# Altium PCB STM32F405RGT6.PcbDoc
Units mil, origin at the board's own origin, x right, y up, seen from the top; angles counter-clockwise.
Board outline 1579.83 x 1186.13 mil, 2 copper layers (Top Layer, Bottom Layer); 36 components, 68 nets, 220 pads, 109 vias.
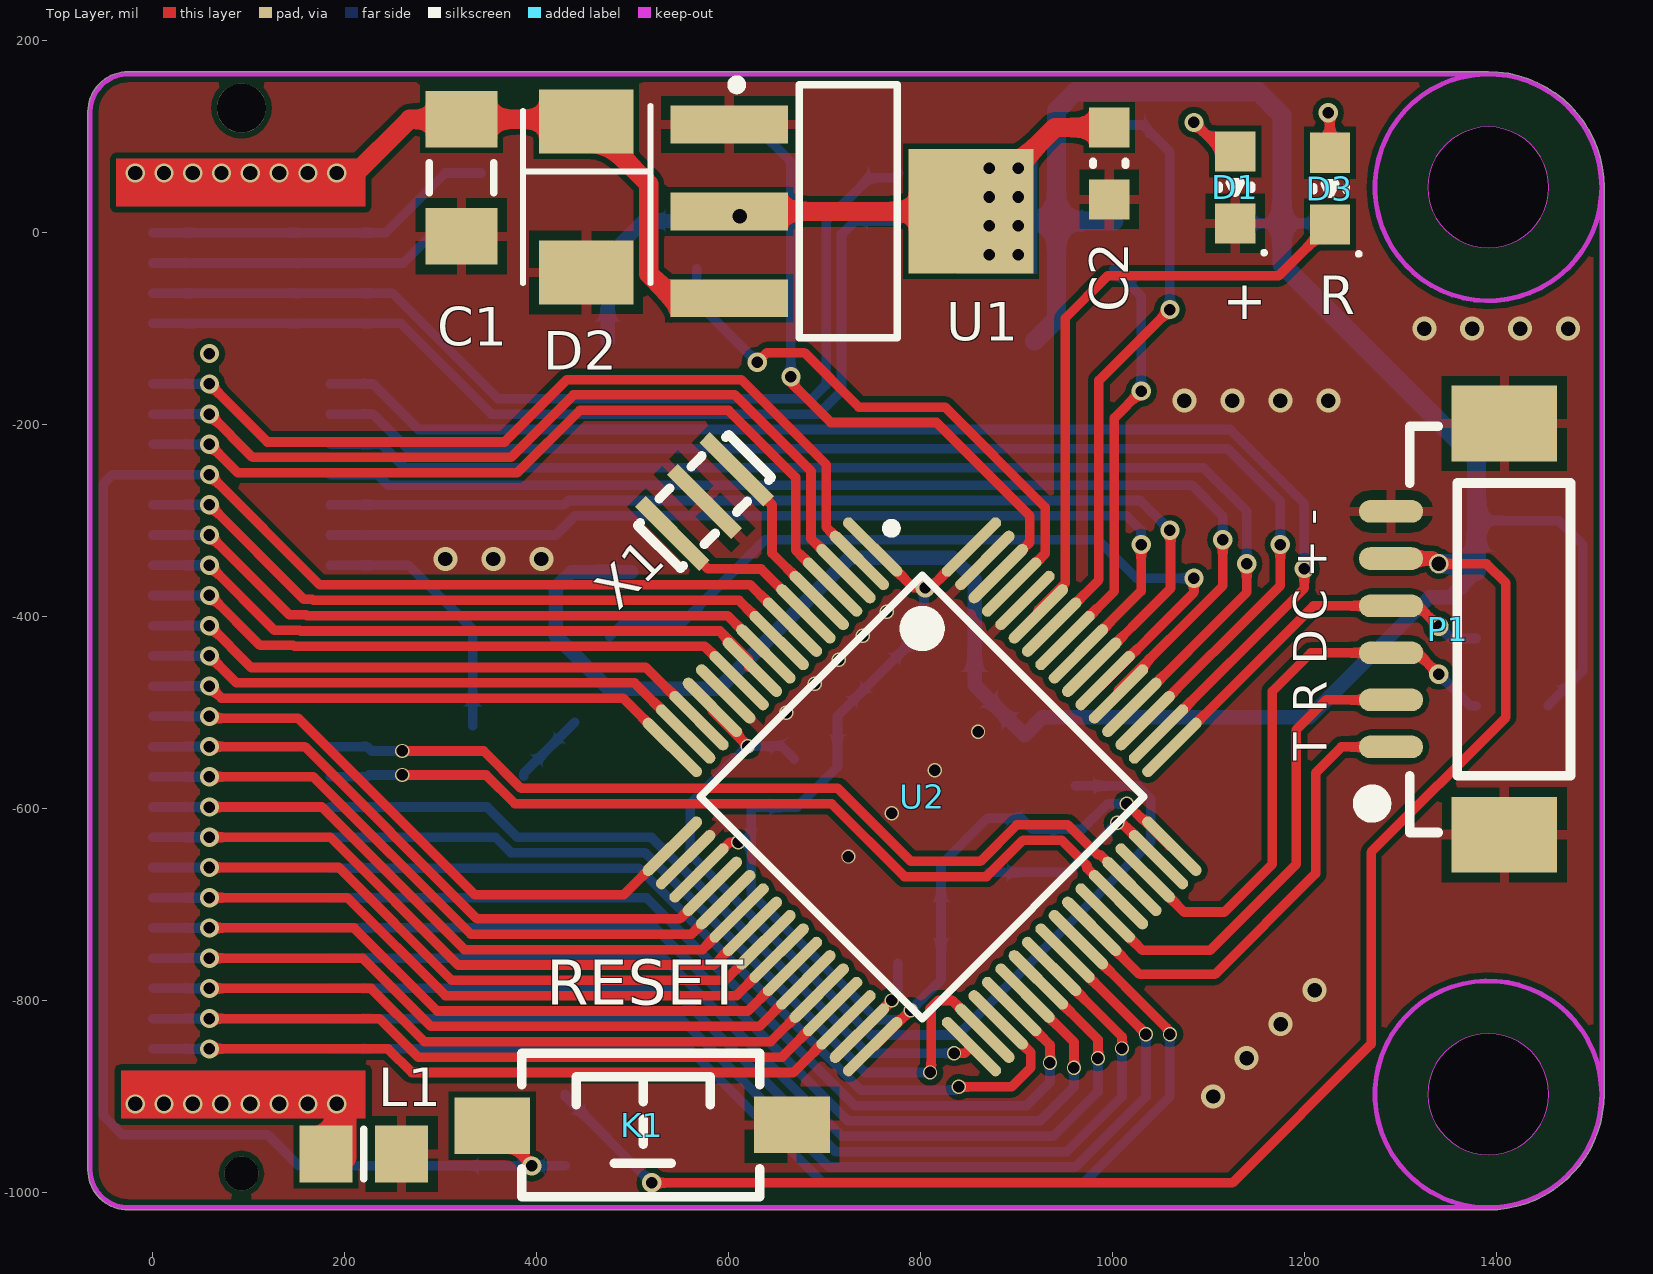
[diagram p0: Top Layer view]
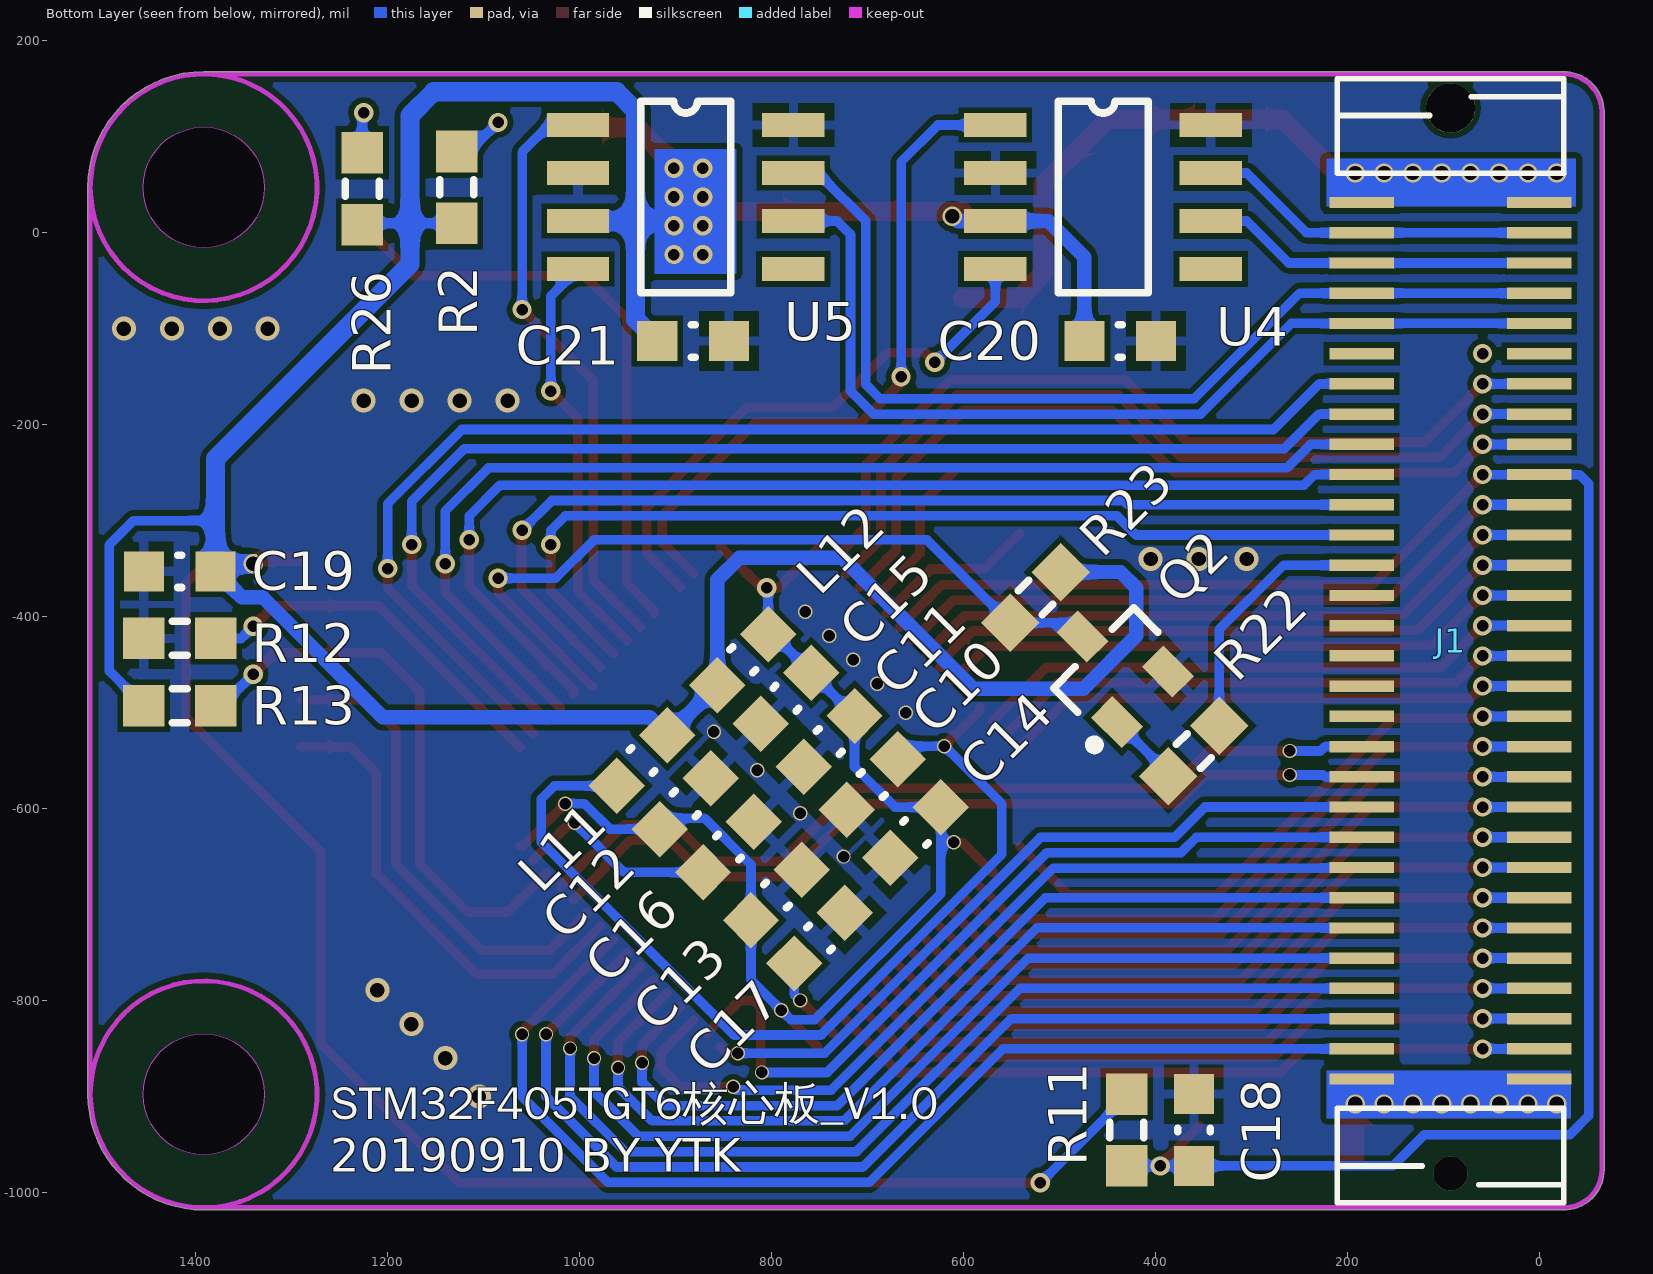
[diagram p1: Bottom Layer view, seen from below]

## Layer stack, top to bottom
Top Solder: solder mask 0.4, Solder Resist, Dk 3.5
Top Layer: signal copper 1.4
Dielectric 1: dielectric 12.6, FR-4, Dk 4.8
Bottom Layer: signal copper 1.4
Bottom Solder: solder mask 0.4, Solder Resist, Dk 3.5

## Board outline
-67.48,-976.38 cw(c-64.96,-976.38) -67.48,-976.36 -67.48,125.98 cw(c-64.96,125.98) -67.48,126.01 cw(c-25.59,125.98) -25.59,167.87 1391.73,167.87 cw(c1391.73,165.35) 1391.76,167.87 cw(c1391.73,47.24) 1512.36,47.24 1512.36,-897.64 cw(c1391.73,-897.64) 1391.73,-1018.26 -25.59,-1018.26 cw(c-25.59,-1015.75) -25.61,-1018.26 cw(c-25.59,-976.38)
cut-out: 1328.74,-897.64 ccw(c1391.73,-897.64) 1391.73,-960.63 ccw(c1391.73,-897.64) 1454.72,-897.64 ccw(c1391.73,-897.64) 1391.73,-834.65 ccw(c1391.73,-897.64)
cut-out: 1328.74,47.24 ccw(c1391.73,47.24) 1391.73,-15.75 ccw(c1391.73,47.24) 1454.72,47.24 ccw(c1391.73,47.24) 1391.73,110.24 ccw(c1391.73,47.24)

## Design rules (kind name [scope] priority, off if disabled: settings)
Clearance 24V [InNetClass('24V')] p1: gap=12
Clearance [All] p2: gap=6
ComponentClearance [All] p1: gap=0 collisioncheckmode=3 verticalgap=0 showdistances=FALSE
DiffPairsRouting [All] p1: maxlimit=10 minlimit=6 mostfreqgap=6 toplayer_minwidth=10 toplayer_maxwidth=10 toplayer_prefwidth=10 bottomlayer_minwidth=10 bottomlayer_maxwidth=10 bottomlayer_prefwidth=10 maxuncoupledlength=500
HoleSize [All] p1: absolutevalues=TRUE maxlimit=10000 minlimit=12 maxpercent=80.000 minpercent=20.000
HoleToHoleClearance [All] p1: gap=6 allowstackedmicrovias=TRUE
MinimumSolderMaskSliver [All] p1: minsoldermaskwidth=0
PolygonConnect VIA [OnLayer('Multi-Layer')] p1: connectstyle=Direct reliefconductorwidth=10 reliefentries=4 polygonreliefangle="90 Angle" airgapwidth=10
PolygonConnect [All] p2: connectstyle=Relief reliefconductorwidth=10 reliefentries=4 polygonreliefangle="90 Angle" airgapwidth=10
RoutingVias [All] p1: holewidth=12 width=15 viastyle="Through Hole" minholewidth=12 minwidth=12 maxholewidth=200 maxwidth=200
SilkToBoardRegionClearance [All] p1 off:
SilkToSilkClearance [All] p1: silktosilkclearance=0
SilkToSolderMaskClearance [IsPad] p1: minsilkscreentomaskgap=0 clearancetoexposedcopper=TRUE
SolderMaskExpansion [All] p1: expansion=4
Width [All] p1: maxlimit=10000 minlimit=6 preferedwidth=10
22 further rules are at their usual default settings.

## Classes and differential pairs
component class 01_STM32F4最小系统: C10 C11 C12 C13 C14 C15 C16 C17 C18 C19 K1 L11 L12 P1 R11 R12 R13 U2 X1
component class 00_连接器和电源: C1 C2 D1 D2 J1 L1 R2 U1
component class 02_其它: C20 C21 D3 Q2 R22 R23 R26 U4 U5
differential pair CAN2: +CAN2_P -CAN2_N
differential pair CAN1: +CAN1_P -CAN1_N
differential pair OSC_8M: +OSC_8M_P -OSC_8M_N
differential pair USB: +USB_P -USB_N

## Components (designator, comment, footprint, x,y, rotation, side; value= is the part's Value field where it differs from the comment)
C1 "22uF/16V" C1206/3216 321.73,57.24 r90 top
C2 "226" C0603/1608 996.73,72.24 r90 top
C10 "104" C0603/1608 695,-575 r315 bottom
C11 "106" C0603/1608 740,-530 r135 bottom
C12 "104" C0603/1608 890,-595 r315 bottom
C13 "104" C0603/1608 795,-690 r315 bottom
C14 "104" C0603/1608 650,-625 r135 bottom
C15 "104" C0603/1608 785,-485 r135 bottom
C16 "225" C0603/1608 845,-640 r315 bottom
C17 "225" C0603/1608 750,-735 r315 bottom
C18 "105" C0603/1608 360,-935 r270 bottom
C19 "104" C0603/1608 1416.73,-352.76 r0 bottom
C20 "104" C0603/1608 436.73,-112.76 r180 bottom
C21 "104" C0603/1608 881.73,-112.76 r180 bottom
D1 "LED-红色" LED0603-红色 1128.03,47.24 r270 top
D2 "SMAJ5.0A" DO-214AC/SMA 451.73,37.24 r90 top
D3 "LED-绿色" LED0603-绿色 1226.73,45.94 r270 top
J1 "STM32F405RGT6核心板" 3710M060037G0FR01 92.52,-425.2 r180 bottom
K1 "KEY" 按键（2脚） 510,-930 r0 top
L1 "UPZ2012E221" L0805/2012 220,-960 r0 top
L11 "UPZ1608E101" L0603/1608 935,-550 r315 bottom
L12 "UPZ1608E101" L0603/1608 830,-445 r135 bottom
P1 "GH1.25-6P-SW\UART\3.3V" GH1.25-6P（卧贴） 1290.35,-535.74 r270 top
Q2 "PMBT3904" SOT-23-3 440,-510 r45 bottom
R2 "1k" R0603/1608 1128.03,47.24 r270 bottom
R11 "1k" R0603/1608 430,-935 r270 bottom
R12 "10k" R0603/1608 1416.73,-422.76 r180 bottom
R13 "10k" R0603/1608 1416.73,-492.76 r180 bottom
R22 "4k7" R0603/1608 360,-540 r135 bottom
R23 "4k7" R0603/1608 525,-380 r315 bottom
R26 "1k" R0603/1608 1226.73,45.94 r270 bottom
U1 "AMS1117-3.3V" SOT-223 726.73,22.24 r0 top
U2 "STM32F405RGT6" LQFP64 801.73,-587.76 r315 top
U4 "SN65HVD230" SOP-8 566.73,112.24 r180 bottom
U5 "SN65HVD230" SOP-8 1001.73,112.24 r180 bottom
X1 "8MHz" XTAL-3213 575,-280 r225 top

## Footprints (in the part's own frame and the unit in brackets; to place one, negate y for a bottom-side part, rotate by r counter-clockwise, add the part's x,y. Pads: shape width x height; smd on the part's side, far side on the other; paste and mask are expansions set on the pad)
3710M060037G0FR01 [mm]
  rect 1.7x0.3 smd: 1(2.35,11.6) 2(2.35,10.8) 3(2.35,10) 4(2.35,9.2) 5(2.35,8.4) 6(2.35,7.6) 7(2.35,6.8) 8(2.35,6) 9(2.35,5.2) 10(2.35,4.4) 11(2.35,3.6) 12(2.35,2.8) 13(2.35,2) 14(2.35,1.2) 15(2.35,0.4) 16(2.35,-0.4) 17(2.35,-1.2) 18(2.35,-2) 19(2.35,-2.8) 20(2.35,-3.6) 21(2.35,-4.4) 22(2.35,-5.2) 23(2.35,-6) 24(2.35,-6.8) 25(2.35,-7.6) 26(2.35,-8.4) 27(2.35,-9.2) 28(2.35,-10) 29(2.35,-10.8) 30(2.35,-11.6) 31(-2.35,-11.6) 32(-2.35,-10.8) 33(-2.35,-10) 34(-2.35,-9.2) 35(-2.35,-8.4) 36(-2.35,-7.6) 37(-2.35,-6.8) 38(-2.35,-6) 39(-2.35,-5.2) 40(-2.35,-4.4) 41(-2.35,-3.6) 42(-2.35,-2.8) 43(-2.35,-2) 44(-2.35,-1.2) 45(-2.35,-0.4) 46(-2.35,0.4) 47(-2.35,1.2) 48(-2.35,2) 49(-2.35,2.8) 50(-2.35,3.6) 51(-2.35,4.4) 52(-2.35,5.2) 53(-2.35,6) 54(-2.35,6.8) 55(-2.35,7.6) 56(-2.35,8.4) 57(-2.35,9.2) 58(-2.35,10) 59(-2.35,10.8) 60(-2.35,11.6)
  round 0.9 hole 0.9: FH(0,-14.1)
  round 1.3 hole 1.3: FH(0,14.1)
  silkscreen extent -3,-14.87 3,14.87
C0603/1608 [mm] "0603/1608贴片陶瓷电容"
  rect 1.06x1.06 smd: 1(-0.95,0) 2(0.95,0)
  silkscreen extent -0.05,-0.43 0.05,0.43, body extent -1.29,-0.48 1.31,0.53, height 0.95
C1206/3216 [mm] "1206/3216贴片陶瓷电容"
  rect 1.5x1.9 smd: 1(-1.55,0) 2(1.55,0)
  silkscreen extent -0.4,-0.85 0.4,0.85, body extent -2.18,-0.92 2.02,0.88, height 0.95
DO-214AC/SMA [mm]
  rect 1.7x2.5 smd: 1(-2,0) 2(2,0)
  silkscreen extent -2.29,-1.7 2.41,1.68, body extent -2.85,-1.25 2.85,1.25, height 1.9
GH1.25-6P（卧贴） [mm]
  rect 2x2.8 smd: 0(-8.559,3) 0(2.325,3)
  oval 0.6x1.7 smd: 1(0,0) 2(-1.245,0) 3(-2.489,0) 4(-3.734,0) 5(-4.984,0) 6(-6.234,0)
  silkscreen extent -8.48,-0.75 2.27,4.75, body extent -9.44,-0.25 3.21,4.95, height 3.5
L0603/1608 [mm] "0603/1608贴片磁珠"
  rect 1.06x1.06 smd: 1(-0.95,0) 2(0.95,0)
  silkscreen extent -0.05,-0.43 0.05,0.43, body extent -0.9,-0.5 0.9,0.5, height 1
L0805/2012 [mm] "0805/2012贴片磁珠"
  rect 1.4x1.5 smd: 1(-1,0) 2(1,0)
  silkscreen extent 0,-0.65 0,0.65, body extent -1.07,-0.7 1.08,0.7, height 0.7
LED0603-红色 [mm]
  rect 1.06x1.06 smd: 1(-0.95,0) 2(0.95,0)
  silkscreen extent -0.13,-0.43 1.78,0.81, body extent -0.8,-0.4 0.8,0.4, height 0.79
LED0603-绿色 [mm]
  rect 1.06x1.06 smd: 1(-0.95,0) 2(0.95,0)
  silkscreen extent -0.13,-0.43 1.78,0.81, body extent -0.8,-0.4 0.8,0.4, height 0.35
LQFP64 [mm]
  oval 2.1x0.3 smd: 1(-5.6,3.75) 2(-5.6,3.25) 3(-5.6,2.75) 4(-5.6,2.25) 5(-5.6,1.75) 6(-5.6,1.25) 7(-5.6,0.75) 8(-5.6,0.25) 9(-5.6,-0.25) 10(-5.6,-0.75) 11(-5.6,-1.25) 12(-5.6,-1.75) 13(-5.6,-2.25) 14(-5.6,-2.75) 15(-5.6,-3.25) 16(-5.6,-3.75) 33(5.6,-3.75) 34(5.6,-3.25) 35(5.6,-2.75) 36(5.6,-2.25) 37(5.6,-1.75) 38(5.6,-1.25) 39(5.6,-0.75) 40(5.6,-0.25) 41(5.6,0.25) 42(5.6,0.75) 43(5.6,1.25) 44(5.6,1.75) 45(5.6,2.25) 46(5.6,2.75) 47(5.6,3.25) 48(5.6,3.75)
  oval 0.3x2.1 smd: 17(-3.75,-5.6) 18(-3.25,-5.6) 19(-2.75,-5.6) 20(-2.25,-5.6) 21(-1.75,-5.6) 22(-1.25,-5.6) 23(-0.75,-5.6) 24(-0.25,-5.6) 25(0.25,-5.6) 26(0.75,-5.6) 27(1.25,-5.6) 28(1.75,-5.6) 29(2.25,-5.6) 30(2.75,-5.6) 31(3.25,-5.6) 32(3.75,-5.6) 49(3.75,5.6) 50(3.25,5.6) 51(2.75,5.6) 52(2.25,5.6) 53(1.75,5.6) 54(1.25,5.6) 55(0.75,5.6) 56(0.25,5.6) 57(-0.25,5.6) 58(-0.75,5.6) 59(-1.25,5.6) 60(-1.75,5.6) 61(-2.25,5.6) 62(-2.75,5.6) 63(-3.25,5.6) 64(-3.75,5.6)
  silkscreen extent -5.72,-4.15 4.15,4.57, body extent -6,-6 6,6, height 1.6
R0603/1608 [mm] "0603/1608贴片电阻"
  rect 1.1x1.1 smd: 1(-0.95,0) 2(0.95,0)
  silkscreen extent -0.2,-0.45 0.2,0.45, body extent -0.8,-0.4 0.8,0.4, height 0.45
SOP-8 [mil]
  rect 65x25 smd: 1(0,0) 2(0,-50) 3(0,-100) 4(0,-150) 5(224.41,-150) 6(224.41,-100) 7(224.41,-50) 8(224.41,0)
  silkscreen extent 65,-175 159,25
SOT-23-3 [mm]
  rect 1.15x0.8 smd: 1(0,0) 2(0,-1.9) 3(2.25,-0.95)
  silkscreen extent -0.12,-2.45 1.82,0.97, body extent -0.38,-2.5 2.62,0.6, height 1.1
SOT-223 [mm]
  rect 3.1x1 smd: 1(-3.2,2.3) 2(-3.2,0) 3(-3.2,-2.3)
  rect 3.3x3.3 smd: 4(3.2,0)
  silkscreen extent -3.12,-3.35 1.25,3.47, body extent -1.9,-3.35 1.8,3.35, height 1.8
XTAL-3213 [mm]
  rect 0.4x2.4 smd: 1(-1.2,0) 2(0,0) 3(1.2,0)
  silkscreen extent -1.7,-0.9 1.7,0.8, body extent -1.63,-0.76 1.57,0.74, height 0.8
按键（2脚） [mm]
  rect 2x1.5 smd: 1(-3.966,-0.01) 2(3.966,0.01)
  silkscreen extent -3.18,-1.89 3.12,1.91, body extent -3.97,-1.87 4.03,1.63, height 2.59

## Part data
C1 C2 C10 C11 C12 C13 C14 C15 C16 C17 C18 C19 C20 C21: library part 陶瓷电容, "陶瓷电容"
D1 D3: library part LED, "发光二极管"
D2: library part 瞬态抑制二极管, "瞬态抑制二极管"
J1: "3710(F/M)060037G0FR01"
K1: library part 按键（2脚）, "按键-2脚贴片"
L1 L11 L12: library part 磁珠, "贴片磁珠"
Q2: library part NPN, "NPN三极管"
R2 R11 R12 R13 R22 R23 R26: library part 电阻, "电阻"
U1: library part AMS1117, "AMS1117低压差线性稳压器"
U2: "微控制器STM32F405RGT6"
U4 U5: "CAN收发芯片"
X1: library part 晶振（带起振电容）, "晶振"

## Free pads (board coordinates)
  round 216.54 on Top Solder: ""(1391.73,-897.64) ""(1391.73,47.24)
  round 216.54 on Bottom Solder: ""(1391.73,-897.64) ""(1391.73,47.24)

## Via types
v1: diameter 20, hole 12, Top Layer to Bottom Layer, tented both sides, 50 vias
v2: diameter 15, hole 12, Top Layer to Bottom Layer, tented both sides, 26 vias
v3: diameter 20, hole 15, Top Layer to Bottom Layer, tented both sides, 18 vias
v4: diameter 25, hole 15, Top Layer to Bottom Layer, tented both sides, 15 vias

## Nets (pads, with @x,y where several pads share a name; then routed paths per layer and width w, separated by ;. In a path a pad name is that pad's centre, name@x,y a point inside that pad or via, vN(x,y) a via of type N, cw(c..) or ccw(c..) an arc to the next point about the centre after c; other vN are vias at no path point)
CAN1_N: J1.3 J1.58 U4.6 | length 360.4
  Bottom Layer w10: J1.3 J1.58 261.08,-31.5 304.82,12.24 U4.6
CAN1_P: J1.2 J1.59 U4.7 | length 368.1
  Bottom Layer w10: J1.2 J1.59 242.58,0 304.82,62.24 U4.7
CAN1_RX: U2.61 U4.4 | length 592
  Top Layer w10: v1(630,-135) 640,-125 678.98,-125 735.73,-181.76 825.73,-181.76 930,-286.02 930,-334.21 U2.61
  Bottom Layer w10: U4.4 566.73,-71.73 v1(630,-135)
CAN1_TX: U2.62 U4.1 | length 724.6
  Top Layer w10: v1(665,-150) 665,-156.02 706.73,-197.76 816.73,-197.76 914,-295.02 914,-322.37 U2.62
  Bottom Layer w10: U4.1 626.73,112.24 665,73.98 v1(665,-150)
CAN2_N: J1.5 J1.56 U5.6 | length 995.4
  Bottom Layer w10: J1.5 J1.56 258.46,-94.49 352.98,-189 693.63,-189 717.73,-164.9 717.73,-1.76 731.73,12.24 U5.6
CAN2_P: J1.4 J1.57 U5.7 | length 1020.2
  Bottom Layer w10: J1.4 J1.57 249.6,-62.99 359.6,-173 687,-173 701.73,-158.27 701.73,12.24 746.73,57.24 772.32,57.24 U5.7
CAN2_RX: U2.57 U5.4 | length 431.7
  Top Layer w10: U2.57 1002,-373.57 1002,-193 v1(1030,-165)
  Bottom Layer w10: U5.4 1030,-66.02 v1(1030,-165)
CAN2_TX: U2.58 U5.1 | length 616
  Top Layer w10: U2.58 986,-361.73 986,-154 v1(1060,-80)
  Bottom Layer w10: U5.1 1031.73,112.24 1060,83.98 v1(1060,-80)
DGND: C1.1 C2.1 C10.2 C11.1 C12.1 C13.1 C14.1 C15.1 C16.1 C17.1 C18.1 C19.2 C20.2 C21.2 D1.2 D2.1 K1.2 L1.2 P1.0 P1.6 Q2.2 R12.1 U1.1 U2.12 U2.18 U2.60 U2.63 U4.2 U4.8 U5.2 U5.8 X1.2
  other v2: 725,-650 770,-605 815,-560 860,-520 660,-500 690,-470 715,-445 740,-420 765,-395
  other v4: 1105,-900 1140,-860 1175.36,-824.64 1210.71,-789.29 305,-340 355,-340 405,-340 1075,-175 1125,-175 1175,-175 1225,-175 1325,-100 1375,-100 1425,-100 1475,-100
GND: J1.30 J1.31 L1.1 | length 259.4
  Top Layer w30: L1.1@197.36,-962.76 197.36,-888.39
  Bottom Layer w10: J1.30 J1.31
  other v3: -18.27,-907.76 11.73,-907.76 41.73,-907.76 71.73,-907.76 101.73,-907.76 131.73,-907.76 161.73,-907.76 191.73,-907.76
LED: D3.2 U2.59 | length 635.9
  Top Layer w10: U2.59 922.83,-393.13 950.87,-365.09 950.87,-89.13 995,-45 1173.19,-45 D3.2
NetC10_1: C10.1 L11.2 U2.13 | length 1017.8
  Top Layer w10: U2.13 583.2,-498.2 v2(620,-535)
  Bottom Layer w10: C10.1 655,-535 v2(620,-535) 560,-595 560,-647.63 748.37,-836 839,-836 1040,-635 1040,-590 1026.45,-576.45 L11.2
NetC11_2: C11.2 C12.2 C13.2 C14.2 C15.2 L12.2 U2.1 U2.19 U2.32 U2.48 U2.64 | length 1369.9
  Top Layer w10: U2.19@569.28,-665.72 U2.19 601.37,-635 v2(610,-635) ; U2.1 792.77,-370 v1(805,-370) 810.7,-370 U2.64 ; U2.32@751.95,-848.05 v2(790,-810) ; v2(1015,-595) 1059.26,-639.26 U2.48
  Bottom Layer w10: v2(610,-635) 623.55,-635 ; v1(805,-370) 803.55,-371.45 L12.2 798.55,-418.55 C15.2 C11.2 713.55,-556.45 671.45,-598.55 C14.2 623.55,-635 ; v2(1015,-595) 995,-595 968.55,-621.45 C12.2 905,-610 870,-610 821.45,-658.55 C13.2 821.45,-778.55 v2(790,-810) 780,-820 755,-820 623.55,-688.55 623.55,-635
NetC16_2: C16.2 U2.47 | length 213.8
  Top Layer w10: v2(1005,-615) 1009.93,-615 U2.47
  Bottom Layer w10: C16.2 953.55,-666.45 v2(1005,-615)
NetC17_2: C17.2 U2.31 | length 89.3
  Top Layer w10: U2.31 736.31,-833.69 v2(770,-800)
  Bottom Layer w10: v2(770,-800) 776.45,-793.55 C17.2
NetD1_1: D1.1 R2.1 | length 111.2
  Top Layer w10: v1(1085,115) 1115.35,84.65 D1.1
  Bottom Layer w10: v1(1085,115) 1115.35,84.65 R2.1
NetD3_1: D3.1 R26.1 | length 84.7
  Top Layer w10: v1(1225,125) 1226.73,123.27 D3.1
  Bottom Layer w10: v1(1225,125) 1226.73,123.27 R26.1
NetQ2_1: Q2.1 R22.1 | length 78.6
  Bottom Layer w10: R22.1 386.45,-563.55 Q2.1
NRST: C18.2 J1.10 K1.1 R11.2 U2.7 | length 2008.8
  Top Layer w10: v1(59.06,-251.97) 174.09,-367 622.73,-367 U2.7 ; K1.1 395,-971.55 v1(395,-972.4)
  Bottom Layer w10: v1(59.06,-251.97) -41.97,-251.97 -51.46,-261.46 -51.46,-920.12 -31.58,-940 120,-940 152.4,-972.4 C18.2 v1(395,-972.4) R11.2
OSC_8M_N: U2.6 X1.3 | length 173.7
  Top Layer w10: X1.3 578.19,-350 607.52,-350 607.87,-350.35 633.92,-350.35 U2.6
OSC_8M_P: U2.5 X1.1 | length 172.2
  Top Layer w10: X1.1 645.35,-283.54 645.35,-333.94 U2.5
PA0: J1.15 U2.14 | length 610.3
  Top Layer w10: v1(59.06,-409.45) 102.61,-453 513.86,-453 U2.14
  Bottom Layer w10: J1.15 v1(59.06,-409.45)
PA1: J1.16 U2.15 | length 589.1
  Top Layer w10: v1(59.06,-440.94) 87.11,-469 502.02,-469 U2.15
  Bottom Layer w10: J1.16 v1(59.06,-440.94)
PA2: J1.17 U2.16 | length 567.9
  Top Layer w10: v1(59.06,-472.44) 71.61,-485 490.19,-485 U2.16
  Bottom Layer w10: J1.17 v1(59.06,-472.44)
PA3: J1.18 U2.17 | length 636.6
  Top Layer w10: v1@61.12,-506 151.76,-506 335.76,-690 490.7,-690 U2.17
  Bottom Layer w10: J1.18 v1(59.06,-503.94)
PA4: J1.19 U2.20 | length 671.7
  Top Layer w10: v1(59.06,-535.43) 158.57,-535.43 338.14,-715 549.21,-715 U2.20
  Bottom Layer w10: J1.19 v1(59.06,-535.43)
PA5: J1.20 U2.21 | length 680.4
  Top Layer w10: v1(59.06,-566.93) 167.44,-566.93 331.51,-731 561.63,-731 597.12,-695.51 U2.21
  Bottom Layer w10: J1.20 v1(59.06,-566.93)
PA6: J1.21 U2.22 | length 688.4
  Top Layer w10: v1(59.06,-598.43) 176.31,-598.43 324.88,-747 572.89,-747 U2.22
  Bottom Layer w10: J1.21 v1(59.06,-598.43)
PA7: J1.22 U2.23 | length 696.7
  Top Layer w10: v1(59.06,-629.92) 185.18,-629.92 318.25,-763 584.73,-763 U2.23
  Bottom Layer w10: J1.22 v1(59.06,-629.92)
PA8: J1.32 U2.41 | length 1172.5
  Top Layer w10: U2.41 1060,-832.1 v2(1060,-835)
  Bottom Layer w10: J1.32 559.12,-850.39 698.23,-989.5 970.5,-989.5 1060,-900 v2(1060,-835)
PA15: J1.54 U2.50 | length 1370
  Top Layer w10: U2.50@1048.11,-521.89 U2.50 1200,-370.44 v1(1200,-350)
  Bottom Layer w10: J1.54 229.48,-157.48 277,-205 1122.63,-205 1200,-282.37 v1(1200,-350)
PB0: J1.25 U2.26 | length 721.8
  Top Layer w10: v1(59.06,-724.41) 209.92,-724.41 296.51,-811 620.25,-811 U2.26
  Bottom Layer w10: J1.25 v1(59.06,-724.41)
PB1: J1.26 U2.27 | length 730.2
  Top Layer w10: v1(59.06,-755.91) 218.79,-755.91 289.88,-827 632.09,-827 U2.27
  Bottom Layer w10: J1.26 v1(59.06,-755.91)
PB2: J1.27 U2.28 | length 738.6
  Top Layer w10: v1(59.06,-787.4) 227.66,-787.4 283.25,-843 643.92,-843 U2.28
  Bottom Layer w10: J1.27 v1(59.06,-787.4)
PB3: J1.50 U2.55 | length 1066.4
  Top Layer w10: U2.55 1060.62,-370.62 v1@1060.62,-310
  Bottom Layer w10: J1.50 428.91,-283.46 433.37,-279 1029,-279 v1(1060,-310)
PB4: J1.49 U2.56 | length 1015.4
  Top Layer w10: U2.56 1030,-373.41 v1(1030,-325)
  Bottom Layer w10: J1.49 420.04,-314.96 440,-295 1015,-295 1030,-310 v1(1030,-325)
PB10: J1.28 U2.29 | length 746.9
  Top Layer w10: v1(59.06,-818.9) 236.52,-818.9 276.63,-859 655.76,-859 U2.29
  Bottom Layer w10: J1.28 v1(59.06,-818.9)
PB11: J1.29 U2.30 | length 755.3
  Top Layer w10: v1(59.06,-850.39) 245.39,-850.39 270,-875 667.6,-875 U2.30
  Bottom Layer w10: J1.29 v1(59.06,-850.39)
PB12: J1.40 U2.33 | length 777.4
  Top Layer w10: v2(835,-855) 846.28,-855 U2.33
  Bottom Layer w10: J1.40 348.43,-598.43 380,-630 519.75,-630 744.75,-855 v2(835,-855)
PB13: J1.39 U2.34 | length 868.8
  Top Layer w10: v2(810,-875) 811.27,-873.73 811.27,-809.77 810,-808.5 818.5,-800 833.02,-800 U2.34
  Bottom Layer w10: J1.39 357.29,-629.92 373.37,-646 513.12,-646 742.12,-875 v2(810,-875)
PB14: J1.38 U2.35 | length 899.7
  Top Layer w10: v2(840.03,-890.01) 894.99,-890.01 915,-870 915,-854.14 U2.35
  Bottom Layer w10: J1.38 185.62,-662 506.49,-662 737.99,-893.5 836.54,-893.5 v2(840.03,-890.01)
PB15: J1.37 U2.36 | length 945.1
  Top Layer w10: U2.36 935,-846.3 v2(935,-865)
  Bottom Layer w10: J1.37 514.78,-692.91 731.36,-909.5 910.5,-909.5 935,-885 v2(935,-865)
PC0: J1.11 U2.8 | length 711.4
  Top Layer w10: v1(59.06,-283.46) 157.59,-382 166.46,-382 167.46,-383 610.9,-383 U2.8
  Bottom Layer w10: J1.11 v1(59.06,-283.46)
PC1: J1.12 U2.9 | length 690.2
  Top Layer w10: v1(59.06,-314.96) 142.09,-398 159.83,-398 160.83,-399 599.06,-399 U2.9
  Bottom Layer w10: J1.12 v1(59.06,-314.96)
PC2: J1.13 U2.10 | length 673.6
  Top Layer w10: v1(59.06,-346.46) 126.6,-414 153.2,-414 154.2,-415 591.15,-415 621.02,-444.88 621.02,-452.74 U2.10
  Bottom Layer w10: J1.13 v1(59.06,-346.46)
PC3: J1.14 U2.11 | length 647.8
  Top Layer w10: v1(59.06,-377.95) 59.95,-377.95 112,-430 146.58,-430 147.58,-431 575.38,-431 U2.11
  Bottom Layer w10: J1.14 v1(59.06,-377.95)
PC4: J1.23 U2.24 | length 705.1
  Top Layer w10: v1(59.06,-661.42) 194.04,-661.42 311.63,-779 596.57,-779 U2.24
  Bottom Layer w10: J1.23 v1(59.06,-661.42)
PC5: J1.24 U2.25 | length 713.5
  Top Layer w10: v1(59.06,-692.91) 202.91,-692.91 305,-795 608.41,-795 U2.25
  Bottom Layer w10: J1.24 v1(59.06,-692.91)
PC6: J1.36 U2.37 | length 991.7
  Top Layer w10: U2.37 960,-843.46 v2(960,-870)
  Bottom Layer w10: J1.36 523.64,-724.41 724.74,-925.5 924.5,-925.5 960,-890 v2(960,-870)
PC7: J1.35 U2.38 | length 1038.4
  Top Layer w10: U2.38 985,-840.62 v2(985,-860)
  Bottom Layer w10: J1.35 532.51,-755.91 718.11,-941.5 938.5,-941.5 985,-895 v2(985,-860)
PC8: J1.34 U2.39 | length 1085
  Top Layer w10: U2.39 1010,-837.78 v2(1010,-850)
  Bottom Layer w10: J1.34 541.38,-787.4 711.48,-957.5 952.5,-957.5 1010,-900 v2(1010,-850)
PC9: J1.33 U2.40 | length 1128.8
  Top Layer w10: U2.40 950.67,-750.67 v2(1035,-835)
  Bottom Layer w10: J1.33 550.25,-818.9 704.85,-973.5 961.5,-973.5 1035,-900 v2(1035,-835)
PC10: J1.53 U2.51 | length 1314.4
  Top Layer w10: U2.51 1175,-367.6 v1(1175,-325)
  Bottom Layer w10: J1.53 229.64,-188.98 265.67,-225 1120,-225 1175,-280 v1(1175,-325)
PC11: J1.52 U2.52 | length 1237.9
  Top Layer w10: U2.52 1140,-374.76 v1(1140,-345)
  Bottom Layer w10: J1.52 238.51,-220.47 263.04,-245 1095,-245 1140,-290 v1(1140,-345)
PC12: J1.51 U2.53 | length 1178.4
  Top Layer w10: U2.53 1006.35,-476.65 1115,-367.99 v1(1115,-320)
  Bottom Layer w10: J1.51 234.01,-251.97 245.04,-263 1083,-263 1115,-295 v1(1115,-320)
PC13: J1.7 U2.2 | length 904.6
  Top Layer w10: v1(59.06,-157.48) 119.57,-218 366.75,-218 431.75,-153 613.25,-153 702,-241.75 702,-307.07 U2.2
  Bottom Layer w10: J1.7 v1(59.06,-157.48)
PC14: J1.8 U2.3 | length 886.5
  Top Layer w10: v1(59.06,-188.98) 104.08,-234 373.37,-234 438.37,-169 606.63,-169 686,-248.37 686,-318.91 U2.3
  Bottom Layer w10: J1.8 v1(59.06,-188.98)
PC15: J1.9 U2.4 | length 868.3
  Top Layer w10: v1(59.06,-220.47) 88.58,-250 380,-250 445,-185 600,-185 670,-255 670,-330.75 U2.4
  Bottom Layer w10: J1.9 v1(59.06,-220.47)
PD2_UART5_RX: Q2.3 R23.2 U2.54 | length 821.2
  Top Layer w10: U2.54@986.43,-472.66 987.34,-472.66 1085,-375 v1(1085,-360)
  Bottom Layer w10: Q2.3 490.66,-406.45 R23.2 637.89,-320 985,-320 1025,-360 v1(1085,-360)
PD2_UART5_RX_DBUS: J1.48 R22.2 | length 276.3
  Bottom Layer w10: J1.48 266.46,-346.46 333.55,-413.55 R22.2
SWCLK: P1.4 R12.2 U2.49 | length 392.5
  Top Layer w10: U2.49 1209.54,-388.74 P1.4 1318.74,-388.74 v1(1340,-410)
  Bottom Layer w10: v1(1340,-410) 1352.76,-422.76 R12.2
SWDIO: P1.3 R13.2 U2.46 | length 602.1
  Top Layer w10: U2.46 1074.85,-707.76 1116.73,-707.76 1166.73,-657.76 1166.73,-477.76 1206.75,-437.74 P1.3 1317.74,-437.74 v1(1340,-460)
  Bottom Layer w10: v1(1340,-460) 1372.76,-492.76 R13.2
USART1_RX: P1.2 U2.43 | length 504.2
  Top Layer w10: U2.43 1031.33,-747.76 1101.73,-747.76 1191.73,-657.76 1191.73,-517.76 1222.75,-486.74 P1.2
USART1_TX: P1.1 U2.42 | length 492.2
  Top Layer w10: U2.42 1028.49,-772.76 1106.73,-772.76 1211.73,-667.76 1211.73,-562.76 1238.75,-535.74 P1.1
USB_N: J1.41 U2.44 | length 908.9
  Top Layer w10: v2(260,-565) 347.37,-565 377.37,-595 707.37,-595 783.37,-671 869,-671 907.01,-632.99 947.01,-632.99 973.58,-659.56 973.58,-662.17 U2.44
  Bottom Layer w10: J1.41 223.5,-566.93 225.43,-565 v2(260,-565)
USB_P: J1.42 U2.45 | length 927
  Top Layer w10: v2(260,-540) 345,-540 384,-579 714,-579 790,-655 862.37,-655 900.38,-616.99 953.64,-616.99 984.9,-648.25 987.5,-648.25 U2.45
  Bottom Layer w10: J1.42 223.5,-535.43 228.07,-540 v2(260,-540)
VCC_3V3: C2.2 C19.1 C20.1 C21.1 L11.1 L12.1 P1.5 R2.2 R11.1 R13.1 R23.1 R26.2 U1.2 U1.4 U4.3 U5.3 | length 5265.7
  Top Layer w10: v1(520,-990) 1125,-990 1269.55,-845.45 1269.55,-645.45 1410,-505 1410,-365 1390,-345 v3(1340,-345)
  Top Layer w15: P1.5 1334.53,-339.53 v3(1340,-345)
  Top Layer w20: U1.2 U1.4 940.12,109.65 C2.2
  Bottom Layer w10: R11.1 430,-900 v1(520,-990) ; R2.2 1176.73,9.84 R26.2@1225.43,9.84 ; 1379.33,-300 1465,-300 1490,-325 1490,-456.89 R13.1
  Bottom Layer w15: C20.1 474.13,-25.35 511.73,12.24 U4.3 606.73,12.24 v3(611.73,17.24) ; R23.1 436.45,-353.55 420,-370 420,-420 475,-475 590,-475 726.5,-338.5 833.5,-338.5 856.45,-361.45 L12.1 L11.1 927.11,-505 1205,-505 1330,-380 1352.09,-380 C19.1
  Bottom Layer w20: 911.73,12.24 941.73,12.24 ; C21.1 941.73,-90.16 941.73,12.24 ; U5.3 941.73,12.24 ; v3(1340,-345) 1367.09,-345 1369.33,-342.76 C19.1 1379.33,-300 1379.33,-235.35 1176.73,-32.76 1176.73,9.84 1176.73,122.24 1152.12,146.85 961.34,146.85 941.73,127.24 941.73,12.24
  other v1: 871.73,-22.76 901.73,-22.76 871.73,7.24 901.73,7.24 871.73,37.24 901.73,37.24 871.73,67.24 901.73,67.24
VCC_5V: C1.2 D2.2 J1.1 J1.60 U1.3 | length 551.5
  Top Layer w20: 206.73,57.24 267.76,118.27 C1.2 449.45,118.27 D2.2 516.94,50.77 516.94,-42.97 542.28,-68.31 U1.3
  other v3: -18.27,62.24 11.73,62.24 41.73,62.24 71.73,62.24 101.73,62.24 131.73,62.24 161.73,62.24 191.73,62.24
pads on no net: J1.6 J1.43 J1.44 J1.45 J1.46 J1.47 J1.55 J1.FH U4.5 U5.5
copper on no net:
  other v1: 59.06,-125.98

## Polygon pours and split planes (outlines as drawn)
DGND on Top Layer "Top Layer-DGND" (solid, remove dead copper, pour order 4): -119.27,-1069.76 -119.27,219.24 -112.27,226.24 -105.27,219.24 1549.73,219.24 1549.73,-1037.76 1497.73,-1089.76
DGND on Bottom Layer "Bottom Layer-DGND" (solid, remove dead copper, pour order 6): -104.27,-1019.76 -97.27,-1012.76 -97.27,226.24 1479.73,226.24 1519.73,186.24 1552.73,153.24 1552.73,-1057.76

## Keep-outs
Keep-Out Layer:
  circle w5: c1391.73,47.24 r118.11
  circle w5: c1391.73,-897.64 r118.11
  lines w5: -25.59,-1015.75 1391.73,-1015.75 ; -25.59,-1015.75 cw(c-25.59,-976.38) -64.96,-976.38 -64.96,125.98 cw(c-25.59,125.98) -25.59,165.35 1391.73,165.35 ; 1509.84,-897.64 1509.84,47.24

## Other copper
Top Layer:
  rectangle net VCC_5V: -38.27,27.24 221.73,77.24
  rectangle net GND: -33.27,-922.76 221.73,-872.76
Bottom Layer:
  rectangle net VCC_3V3: 836.73,-42.76 921.73,87.24
  rectangle net VCC_5V: -38.27,27.24 221.73,77.24
  rectangle net GND: -33.27,-922.76 221.73,-872.76

## Silkscreen, mask and mechanical layers (free items; w line width, h text height)
Top Overlay:
  text "R" at 1215,-85 h40
  text "+" at 1115,-90 h40
  text "-" at 1235,-305 h60 r90
  text "+" at 1235,-360 h60 r90
  text "C" at 1235,-405 h60 r90
  text "D" at 1235,-450 h60 r90
  text "R" at 1235,-500 h60 r90
  text "T" at 1235,-550 h60 r90
  text "RESET" at 410,-820 h80
Bottom Overlay:
  text "STM32F405TGT6核心板_V1.0" at 1260,-935 h60
  text "20190910 BY YTK" at 1260,-990 h60
Mechanical 1:
  circle w5: c1391.73,47.24 r62.99
  circle w5: c1391.73,-897.64 r62.99
Mechanical 15:
  lines w5: 1372.05,-897.64 1411.42,-897.64 ; 1372.05,47.24 1411.42,47.24 ; 1391.73,-917.32 1391.73,-877.95 ; 1391.73,27.56 1391.73,66.93 ; 72.83,-425.2 112.2,-425.2 ; 72.83,-425.2 112.2,-425.2 ; 72.83,-425.2 112.2,-425.2 ; 92.52,-444.88 92.52,-405.51 ; 92.52,-444.88 92.52,-405.51 ; 92.52,-444.88 92.52,-405.51